# Altium PCB Skipper.PcbDoc (part 3 of 3)
Units mm, origin at the board's own origin, x right, y up, seen from the top; angles counter-clockwise.
Board outline 132 x 77.5 mm, 4 copper layers (L1, L2, L3, L4), stack 1.586 mm thick; 219 components, 173 nets, 859 pads, 487 vias.
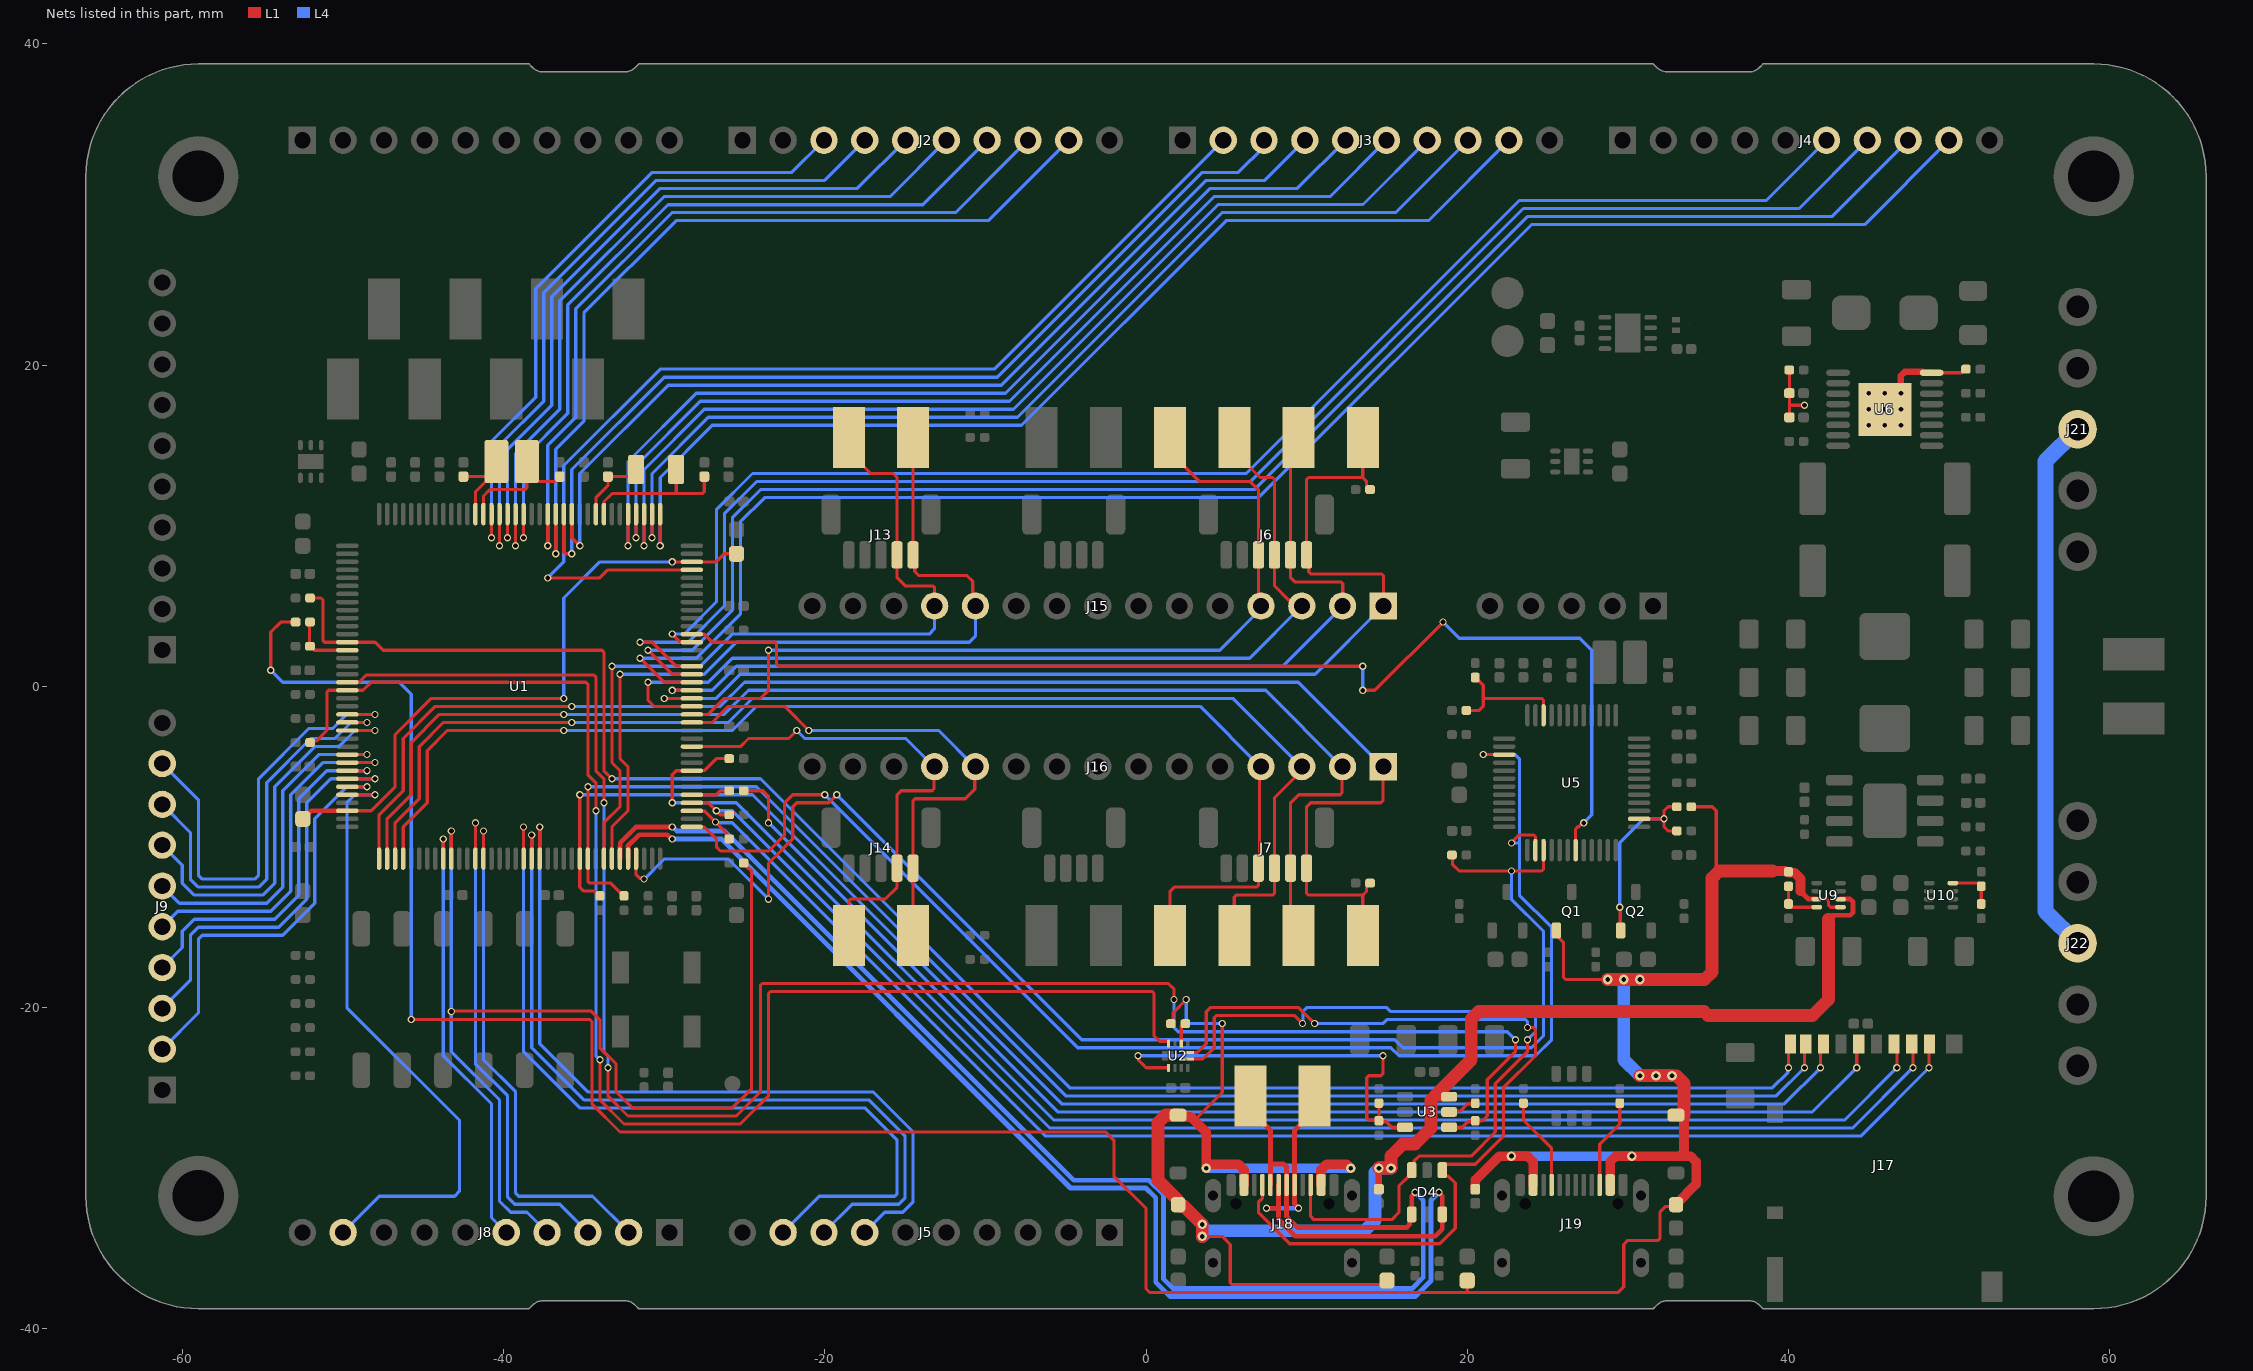
[diagram p5: the nets of this part, all layers, seen from the top]

## Via types
v1: diameter 0.45, hole 0.3, L1 to L4, tented both sides, 298 vias
v2: diameter 0.6, hole 0.3, L1 to L4, tented both sides, 127 vias
v3: diameter 1.25, hole 1, L1 to L4, 39 vias
v4: diameter 0.6, hole 0.3, L1 to L4, 15 vias
v5: diameter 0.5, hole 0.3, L1 to L4, 8 vias

## Nets (pads, with @x,y where several pads share a name; then routed paths per layer and width w, separated by ;. In a path a pad name is that pad's centre, name@x,y a point inside that pad or via, vN(x,y) a via of type N, cw(c..) or ccw(c..) an arc to the next point about the centre after c; other vN are vias at no path point) (continued)
PD12: J8.5 U1.81 | length 27.3
  L1 w0.2: U1.81@-43.75,-10.725 v1(-43.75,-9.5)
  L4 w0.2: v1(-43.75,-9.5) -43.75,-23 -40.75,-26 -40.75,-33.08 J8.5@-39.83,-34
PD13/LED: J8.4 R11.2 U1.82 | length 68.4
  L1 w0.2: U1.82@-43.269,-11.321 -43.25,-11.302 U1.82@-43.25,-10.725 v1(-43.25,-9) ; v1(-43.25,-20.25) -43.222,-20.222 -34.528,-20.222 -34,-20.75 -34,-22.5 -33,-23.5 -33,-25.25 -32,-26.25 -25.75,-26.25 -24.557,-25.057 -24.557,-11.518 -24.85,-11.225 -24.85,-11.195 -25.045,-11 R11.2@-25.075,-11
  L4 w0.2: v1(-43.25,-9) v1(-43.25,-20.25) -43.25,-22.75 -40.25,-25.75 -40.25,-32.05 -39.55,-32.75 -38.54,-32.75 J8.4@-37.29,-34
PD14: J8.3 U1.85 | length 32.3
  L1 w0.2: U1.85@-41.75,-10.725 v1(-41.75,-8.5)
  L4 w0.2: v1(-41.75,-8.5) -41.75,-23.5 -39.75,-25.5 -39.75,-31.8 -39.3,-32.25 -36.5,-32.25 J8.3@-34.75,-34
PD15: J8.2 U1.86 | length 33.2
  L1 w0.2: U1.86@-41.25,-10.725 v1(-41.25,-9)
  L4 w0.2: v1(-41.25,-9) -41.25,-23.25 -39.25,-25.25 -39.25,-31.55 -39.05,-31.75 -34.46,-31.75 J8.2@-32.21,-34
PE0: J3.2 U1.141 | length 66.2
  L1 w0.2: v1(-37.25,6.75) -34,6.75 -33.5,7.25 U1.141@-28.275,7.25
  L4 w0.2: v1(-37.25,6.75) -36.25,7.75 -36.25,13.75 -30.25,19.75 -9.44,19.75 J3.2@4.895,34.085
PE2: J3.9 U1.1 | length 67.8
  L1 w0.2: v1(-30.25,8.75) U1.1@-30.25,10.725
  L4 w0.2: v1(-30.25,8.75) -30.25,13 -27,16.25 -7.75,16.25 5,29 17.59,29 J3.9@22.59,34
PE3: J3.8 U1.2 | length 64.9
  L1 w0.2: v1(-30.75,9.25) U1.2@-30.75,10.725
  L4 w0.2: v1(-30.75,9.25) -30.75,13.25 -27.25,16.75 -8,16.75 4.75,29.5 15.55,29.5 J3.8@20.05,34
PE4: J3.7 U1.3 | length 64
  L1 w0.2: v1(-31.25,8.75) U1.3@-31.25,10.725
  L4 w0.2: v1(-31.25,8.75) -31.25,13.5 -27.5,17.25 -8.25,17.25 4.5,30 13.51,30 J3.7@17.51,34
PE5: J3.6 U1.4 | length 61.1
  L1 w0.2: v1(-31.75,9.25) U1.4@-31.75,10.725
  L4 w0.2: v1(-31.75,9.25) -31.75,13.75 -27.75,17.75 -8.5,17.75 4.25,30.5 11.47,30.5 J3.6@14.97,34
PE6: J3.5 U1.5 | length 60.2
  L1 w0.2: v1(-32.25,8.75) U1.5@-32.25,10.725
  L4 w0.2: v1(-32.25,8.75) -32.25,14 -28,18.25 -8.75,18.25 4,31 9.43,31 J3.5@12.43,34
PE7: J9.9 U1.58 | length 28.5
  L1 w0.2: U1.58@-49.725,-1.75 v1(-48,-1.75)
  L4 w0.2: J9.9@-61.25,-4.81 -59,-7.06 -59,-11.75 -58.75,-12 -55.5,-12 -55.25,-11.75 -55.25,-5.75 -52.125,-2.625 -50.625,-2.625 -49.75,-1.75 v1(-48,-1.75)
PE8: J9.8 U1.59 | length 25.6
  L1 w0.2: U1.59@-49.725,-2.25 v1(-48.5,-2.25)
  L4 w0.2: J9.8@-61.25,-7.35 -59.5,-9.1 -59.5,-12 -59,-12.5 -55.25,-12.5 -54.75,-12 -54.75,-6 -52,-3.25 -50.5,-3.25 -49.5,-2.25 v1(-48.5,-2.25)
PE9: J9.7 U1.60 | length 24.7
  L1 w0.2: U1.60@-49.725,-2.75 v1(-48,-2.75)
  L4 w0.2: J9.7@-61.25,-9.89 -60,-11.14 -60,-12.25 -59.25,-13 -55,-13 -54.25,-12.25 -54.25,-6.25 -51.75,-3.75 -50.25,-3.75 -49.25,-2.75 v1(-48,-2.75)
PE10: J9.6 U1.63 | length 21.8
  L1 w0.2: U1.63@-49.725,-4.25 v1(-48.5,-4.25)
  L4 w0.2: J9.6@-61.25,-12.43 -60.18,-13.5 -54.75,-13.5 -53.75,-12.5 -53.75,-6.5 -51.5,-4.25 v1(-48.5,-4.25)
PE11: J9.5 U1.64 | length 22.7
  L1 w0.2: U1.64@-49.725,-4.75 v1(-48,-4.75)
  L4 w0.2: J9.5@-61.25,-14.97 -60.28,-14 -54.5,-14 -53.25,-12.75 -53.25,-6.75 -51.25,-4.75 v1(-48,-4.75)
PE12: J9.4 U1.65 | length 23.2
  L1 w0.2: U1.65@-49.725,-5.25 v1(-48.5,-5.25)
  L4 w0.2: J9.4@-61.25,-17.51 -60,-16.26 -60,-15.25 -59.25,-14.5 -54.25,-14.5 -52.75,-13 -52.75,-7 -51,-5.25 v1(-48.5,-5.25)
PE13: J9.3 U1.66 | length 26.1
  L1 w0.2: U1.66@-49.725,-5.75 v1(-48,-5.75)
  L4 w0.2: J9.3@-61.25,-20.05 -59.5,-18.3 -59.5,-15.5 -59,-15 -54,-15 -52.25,-13.25 -52.25,-7.25 -50.75,-5.75 v1(-48,-5.75)
PE14: J9.2 U1.67 | length 26.5
  L1 w0.2: U1.67@-49.725,-6.25 v1(-48.5,-6.25)
  L4 w0.2: J9.2@-61.25,-22.59 -59,-20.34 -59,-15.75 -58.75,-15.5 -53.75,-15.5 -51.75,-13.5 -51.75,-8.25 -49.75,-6.25 v1(-48.5,-6.25)
PE15: J8.9 U1.68 | length 39.1
  L1 w0.2: U1.68@-49.725,-6.75 v1(-48,-6.75)
  L4 w0.2: J8.9@-49.99,-34 -47.74,-31.75 -43.05,-31.75 -42.75,-31.45 -42.75,-27 -49.75,-20 -49.75,-7.25 -49.25,-6.75 v1(-48,-6.75)
PF2: J3.4 U1.12 | length 60.4
  L1 w0.2: U1.12@-35.75,10.725 -35.75,9.25 v1(-35.25,8.75)
  L4 w0.2: v1(-35.25,8.75) -35.25,13.25 -29.75,18.75 -9,18.75 3.75,31.5 7.39,31.5 J3.4@9.89,34
PF3: J3.3 U1.13 | length 60
  L1 w0.2: U1.13@-36.25,10.725 -36.25,8.367 -36.133,8.25 v1(-35.75,8.25)
  L4 w0.2: v1(-35.75,8.25) -35.75,13.5 -30,19.25 -9.25,19.25 3.5,32 5.75,32 7.35,33.6 J3.3@7.35,34
PF4: J2.9 U1.14 | length 52.8
  L1 w0.2: v1(-36.75,8.25) U1.14@-36.75,10.725
  L4 w0.2: v1(-36.75,8.25) -36.75,14.75 -35,16.5 -35,23.25 -29.25,29 -9.81,29 J2.9@-4.81,34
PF5: J2.8 U1.15 | length 49.9
  L1 w0.2: v1(-37.25,8.75) U1.15@-37.25,10.725
  L4 w0.2: v1(-37.25,8.75) -37.25,15 -35.5,16.75 -35.5,23.5 -29.5,29.5 -11.85,29.5 -9.1,32.25 J2.8@-7.35,34
PF6: J2.7 U1.18 | length 47.5
  L1 w0.2: v1(-38.75,9.25) U1.18@-38.75,10.725
  L4 w0.2: v1(-38.75,9.25) -38.75,14.25 -36,17 -36,23.75 -29.763,29.987 -13.903,29.987 J2.7@-9.89,34
PF7: J2.6 U1.19 | length 46.6
  L1 w0.2: v1(-39.25,8.75) U1.19@-39.25,10.725
  L4 w0.2: v1(-39.25,8.75) -39.25,14.5 -36.5,17.25 -36.5,24 -30,30.5 -15.93,30.5 J2.6@-12.43,34
PF8: J2.5 U1.20 | length 43.7
  L1 w0.2: v1(-39.75,9.25) U1.20@-39.75,10.725
  L4 w0.2: v1(-39.75,9.25) -39.75,14.75 -37,17.5 -37,24.25 -30.25,31 -17.97,31 J2.5@-14.97,34
PF9: J2.4 U1.21 | length 42.8
  L1 w0.2: v1(-40.25,8.75) U1.21@-40.25,10.725
  L4 w0.2: v1(-40.25,8.75) -40.25,15 -37.5,17.75 -37.5,24.5 -30.5,31.5 -20.01,31.5 J2.4@-17.51,34
PF10: J2.3 U1.22 | length 39.9
  L1 w0.2: v1(-40.75,9.25) U1.22@-40.75,10.725
  L4 w0.2: v1(-40.75,9.25) -40.75,15.25 -38,18 -38,24.75 -30.75,32 -22.05,32 J2.3@-20.05,34
PG6: J5.9 U1.91 | length 52.9
  L1 w0.2: U1.91@-38.75,-10.725 v1(-38.75,-8.75)
  L4 w0.2: v1(-38.75,-8.75) -38.75,-22.75 -35.25,-26.25 -17.5,-26.25 -15.5,-28.25 -15.5,-31.6 -15.65,-31.75 -20.34,-31.75 J5.9@-22.59,-34
PG7: J5.8 U1.92 | length 50
  L1 w0.2: U1.92@-38.25,-10.725 v1(-38.25,-9.25)
  L4 w0.2: v1(-38.25,-9.25) -38.25,-22.5 -35,-25.75 -17.25,-25.75 -15,-28 -15,-31.85 -15.4,-32.25 -18.3,-32.25 J5.8@-20.05,-34
PG8: J5.7 U1.93 | length 49.2
  L1 w0.2: U1.93@-37.75,-10.725 v1(-37.75,-8.75)
  L4 w0.2: v1(-37.75,-8.75) -37.75,-22.25 -34.75,-25.25 -17,-25.25 -14.5,-27.75 -14.5,-32.1 -15.15,-32.75 -16.26,-32.75 J5.7@-17.51,-34
PG12: J4.9 U1.127 | length 102.1
  L1 w0.2: v1(-31.5,1.75) -30,0.25 U1.127@-28.275,0.25
  L4 w0.2: v1(-31.5,1.75) -28,1.75 -25.25,4.5 -25.25,10.25 -23.75,11.75 7,11.75 24,28.75 44.74,28.75 J4.9@49.99,34
PG13: J4.8 U1.128 | length 98.3
  L1 w0.2: v1(-31,2.25) -29.5,0.75 U1.128@-28.275,0.75
  L4 w0.2: v1(-31,2.25) -28.25,2.25 -25.75,4.75 -25.75,10.5 -24,12.25 6.75,12.25 23.75,29.25 42.7,29.25 J4.8@47.45,34
PG14: J4.7 U1.129 | length 96.6
  L1 w0.2: v1(-31.5,2.75) -30.75,2.75 -29.269,1.269 -28.294,1.269 U1.129@-28.275,1.25
  L4 w0.2: v1(-31.5,2.75) -28.5,2.75 -26.25,5 -26.25,10.75 -24.25,12.75 6.5,12.75 23.5,29.75 40.66,29.75 J4.7@44.91,34
PG15: J4.6 U1.132 | length 89.4
  L1 w0.2: v1(-29.5,3.25) -29.019,2.769 -28.294,2.769 U1.132@-28.275,2.75
  L4 w0.2: v1(-29.5,3.25) -28.75,3.25 -26.75,5.25 -26.75,11 -24.5,13.25 6.25,13.25 23.25,30.25 38.62,30.25 J4.6@42.37,34
PMUX1_PR1_10: R61.1 R63.2 U9.4 | length 3
  L1 w0.2: R63.2@40,-13.578 40.172,-13.75 U9.4@41.762,-13.75 ; R63.2@40,-13.575 R61.1@40,-12.425
PMUX2_PR1_10: R62.1 R64.2 U10.4 | length 3
  L1 w0.2: U10.4@50.237,-12.25 51.828,-12.25 52,-12.422 52,-12.425 R62.1@52,-13.575
RENUM_9: Q2.1 R50.1 R51.2 U5.38 | length 13.2
  L1 w0.2: v1(29.5,-13.75) 29.525,-13.775 29.525,-15.175 Q2.1@29.55,-15.2 ; U5.38@30.7,-8.25 v1(32.25,-8.25) ; R51.2@33.075,-9 32.5,-9 32.25,-8.75 v1(32.25,-8.25) ; R50.1@33.075,-7.5 32.5,-7.5 32.25,-7.75 v1(32.25,-8.25)
  L4 w0.2: v1(29.5,-13.75) 29.5,-9.75 31,-8.25 v1(32.25,-8.25)
RTN_10: C60.1 C61.1 R59.1 R60.1 U6.8 U6.17 | length 9.3
  L1 w0.2: C61.1@40.06,16.75 40.06,17.5 ; R60.1@40.06,19.7 40.06,17.5 ; v1(41,17.5) 40.06,17.5 ; U6.8@48.912,19.525 50.78,19.525 51.005,19.75 R59.1@51.075,19.75
  L1 w0.4: v4(47,18.25) 47,19.34 47.234,19.574 48.338,19.574 48.386,19.525 U6.8@48.912,19.525
  other v4: 45,16.25 46,16.25 47,16.25 45,17.25 46,17.25 47,17.25 45,18.25 46,18.25
SDMMC_CLK: J17.5 R18.1 | length 80.9
  L1 w0.2: R18.1@-24.962,-6.5 -23.867,-6.5 -23.5,-6.867 v1(-23.5,-8.5) ; v1(44.25,-23.75) 44.25,-22.65 J17.5@44.375,-22.525
  L4 w0.2: v1(-23.5,-8.5) -5.5,-26.5 41.5,-26.5 v1(44.25,-23.75)
SDMMC_CLK_OUT_2: R18.2 U1.113 | length 2.5
  L1 w0.2: U1.113@-28.275,-6.75 -26.75,-6.75 -26.5,-6.5 R18.2@-25.925,-6.5
SDMMC_CMD: J17.3 R26.1 U1.116 | length 92.6
  L1 w0.2: v1(-29.5,-7.25) -29.5,-5.5 -29.25,-5.25 U1.116@-28.275,-5.25 -28.269,-5.244 -27.494,-5.244 -26.75,-4.5 R26.1@-26.117,-4.5 ; J17.3@46.575,-22.525 46.75,-22.7 v1(46.75,-23.75)
  L4 w0.2: v1(-29.5,-7.25) -25.5,-7.25 -5.75,-27 43.5,-27 v1(46.75,-23.75)
SDMMC_D0: J17.7 R22.1 U1.98 | length 94.7
  L1 w0.2: v1(-35.25,-6.75) -35.25,-12.5 -35,-12.75 -34.325,-12.75 -34.202,-12.873 -34.172,-12.873 -34,-13.045 R22.1@-34,-13.075 ; v1(42,-23.75) 42,-22.7 J17.7@42.175,-22.525
  L4 w0.2: v1(-35.25,-6.75) -24.5,-6.75 -5.25,-26 39.75,-26 v1(42,-23.75)
SDMMC_D1: J17.8 R23.1 U1.99 | length 94.2
  L1 w0.2: v1(-34.75,-6.25) -34.75,-12.133 -34.633,-12.25 -33.325,-12.25 -32.725,-12.85 -32.695,-12.85 -32.5,-13.045 R23.1@-32.5,-13.075 ; v1(41,-23.75) 41,-22.6 J17.8@41.075,-22.525
  L4 w0.2: v1(-34.75,-6.25) -24.25,-6.25 -5,-25.5 39.25,-25.5 v1(41,-23.75)
SDMMC_D2: J17.1 R24.1 U1.111 | length 89.9
  L1 w0.2: U1.111@-28.275,-7.75 -28.256,-7.769 -27.635,-7.769 -27.622,-7.783 -27.467,-7.783 v1(-26.798,-8.452) -26.109,-9.141 -26.109,-9.328 -25.937,-9.5 R24.1@-25.75,-9.5 ; v1(48.75,-23.75) 48.75,-22.55 J17.1@48.775,-22.525
  L4 w0.2: v1@-26.75,-8.5 -25.75,-8.5 -6.25,-28 44.5,-28 v1(48.75,-23.75)
SDMMC_D3: J17.2 R25.1 U1.112 | length 88.4
  L1 w0.2: U1.112@-28.275,-7.25 -27.25,-7.25 v1(-26.75,-7.75) -26.5,-8 -25.823,-8 R25.1@-25.69,-7.867 ; J17.2@47.675,-22.525 47.75,-22.6 v1(47.75,-23.75)
  L4 w0.2: v1(-26.75,-7.75) -25.75,-7.75 -6,-27.5 44,-27.5 v1(47.75,-23.75)
SDMMC_DETECT: J17.SWB R27.1 U1.49 | length 112.4
  L1 w0.2: R27.1@-52.075,5.5 -51.367,5.5 -51.25,5.383 -51.25,2.867 -51.133,2.75 U1.49@-49.725,2.75 -48,2.75 -47.5,2.25 -33.867,2.25 -33.75,2.133 -33.75,-5.25 v1(-33.25,-5.75) ; v1(40,-23.75) 40,-22.65 J17.SWB@40.125,-22.525
  L4 w0.2: v1(-33.25,-5.75) -24,-5.75 -4.75,-25 39,-25 39.954,-24.046 39.954,-23.796 v1(40,-23.75)
SHIELD_11: J21.3 J22.3 | length 33.7
  L4 w1: J22.3@58,-16 56,-14 56,14 J21.3@58,16
SPI1_C\S\: J6.6 J15.1 R1.1 TP10.1 U1.125 | length 68.3
  L1 w0.2: v1(-30,-0.75) U1.125@-28.275,-0.75 ; TP10.1@13.5,15.5 13.5,13 ; R1.1@13.925,12.25 13.895,12.25 13.723,12.422 13.723,12.777 13.5,13 ; J15.1@14.78,5 14.78,6.883 14.663,7 10.25,7 10.133,7.117 10.133,8.047 J6.6@10,8.18 10,12.883 10.117,13 13.5,13
  L4 w0.2: v1(-30,-0.75) -26.75,-0.75 -25.25,0.75 10.53,0.75 J15.1@14.78,5
SPI1_MISO: J6.4 J15.3 TP14.1 U1.124 | length 60.2
  L1 w0.2: v1(-31,0.25) -31,-0.883 -30.633,-1.25 U1.124@-27.725,-1.25 ; TP14.1@5.5,15.5 5.5,14.6 7.1,13 7.883,13 8,12.883 J6.4@8,8.18 8,6.25 8.862,5.388 8.906,5.388 9.294,5 J15.3@9.7,5
  L4 w0.2: v1(-31,0.25) -27.25,0.25 -25.75,1.75 6.45,1.75 J15.3@9.7,5
SPI1_MOSI: J6.3 J15.4 TP16.1 U1.123 | length 54.5
  L1 w0.2: U1.123@-28.275,-1.75 -27.25,-1.75 -26.25,-0.75 -24,-0.75 -23.5,-0.25 v1(-23.5,2.25) ; TP16.1@1.5,15.5 1.5,14.6 3.35,12.75 6.5,12.75 7,12.25 7,5.16 J15.4@7.16,5
  L4 w0.2: v1(-23.5,2.25) 4.59,2.25 7.16,4.82 J15.4@7.16,5
SPI1_SCLK: J6.5 J15.2 TP12.1 U1.126 | length 58.9
  L1 w0.2: v1(-29.5,-0.25) U1.126@-28.275,-0.25 ; TP12.1@9.5,15.5 9,15 J6.5@9,8.18 9,6.75 9.25,6.5 12.133,6.5 12.25,6.383 12.25,5.01 J15.2@12.24,5
  L4 w0.2: v1(-29.5,-0.25) -27,-0.25 -25.5,1.25 8.51,1.25 J15.2@12.25,4.99
SPI2_C\S\: J7.6 J16.1 R8.1 TP11.1 U1.73 | length 92.1
  L1 w0.2: U1.73@-47.75,-10.725 -47.75,-8 -46.25,-6.5 -46.25,-3.25 -44.25,-1.25 v1(-35.75,-1.25) ; TP11.1@13.5,-15.5 13.5,-13 ; R8.1@13.925,-12.25 13.9,-12.25 13.728,-12.422 13.728,-12.772 13.5,-13 ; J16.1@14.74,-5 14.75,-5.01 14.75,-7.133 14.633,-7.25 10.25,-7.25 10,-7.5 J7.6@10,-11.32 10,-12.883 10.117,-13 13.5,-13
  L4 w0.2: v1(-35.75,-1.25) -26.5,-1.25 -25,0.25 9.49,0.25 J16.1@14.74,-5
SPI2_MISO: J7.4 J16.3 TP15.1 U1.75 | length 79.1
  L1 w0.2: U1.75@-46.75,-10.725 -46.75,-8.5 -45.25,-7 -45.25,-3.75 -43.75,-2.25 v1(-35.75,-2.25) ; TP15.1@5.5,-15.5 5.5,-13.117 5.617,-13 7.883,-13 8,-12.883 J7.4@8,-11.32 8,-6.933 9.66,-5.273 J16.3@9.66,-5
  L4 w0.2: v1(-35.75,-2.25) -26,-2.25 -24.5,-0.75 5.41,-0.75 J16.3@9.66,-5
SPI2_MOSI: J7.3 J16.4 TP17.1 U1.76 | length 77.7
  L1 w0.2: U1.76@-46.25,-10.725 -46.25,-8.75 -44.75,-7.25 -44.75,-4 -43.5,-2.75 v1(-36.25,-2.75) ; TP17.1@1.5,-15.5 1.5,-12.75 1.75,-12.5 6.883,-12.5 7,-12.383 J7.3@7,-11.32 7.06,-11.26 7.06,-5.06 J16.4@7.12,-5
  L4 w0.2: v1(-36.25,-2.75) -25.75,-2.75 -24.25,-1.25 3.37,-1.25 J16.4@7.12,-5
SPI2_SCLK: J7.5 J16.2 TP13.1 U1.74 | length 82.7
  L1 w0.2: U1.74@-47.25,-10.725 -47.25,-8.25 -45.75,-6.75 -45.75,-3.5 -44,-1.75 v1(-36.25,-1.75) ; TP13.1@9.5,-15.5 9,-15 J7.5@9,-11.32 9,-7.25 9.5,-6.75 12.083,-6.75 12.2,-6.633 J16.2@12.2,-5
  L4 w0.2: v1(-36.25,-1.75) -26.25,-1.75 -24.75,-0.25 7.45,-0.25 J16.2@12.2,-5
SWCLK: U1.109 U5.15 U5.26 | length 89.3
  L1 w0.2: U1.109@-28.275,-8.75 -28.269,-8.756 -27.494,-8.756 -26.75,-9.5 -26.75,-10 -26.5,-10.25 -23.5,-10.25 -22.5,-9.25 -22.5,-7.25 -22,-6.75 v1(-20,-6.75) ; v1(21,-4.25) U5.15@22.3,-4.25 ; v1(22.75,-9.75) 23.25,-9.25 24.133,-9.25 24.25,-9.367 U5.26@24.25,-10.2
  L4 w0.2: v1(-20,-6.75) -4.25,-22.5 15.25,-22.5 15.75,-23 24.25,-23 25.25,-22 25.25,-15 23.25,-13 23.25,-9.75 ; v1(21,-4.25) 23,-4.25 23.25,-4.5 23.25,-9.75 ; v1(22.75,-9.75) 23.25,-9.75
SWDIO: R43.1 U1.105 U5.27 | length 89.9
  L1 w0.2: U1.105@-31.75,-10.725 -31.75,-11.725 -31.523,-11.952 -31.298,-11.952 v1(-31.25,-12) ; v1(-23.5,-13.25) -23.5,-11 -22,-9.5 -22,-7.5 -21.75,-7.25 -19.75,-7.25 v1(-19.25,-6.75) ; R43.1@19.075,-10.5 19.075,-11.075 19.5,-11.5 v1(22.75,-11.5) 24.633,-11.5 24.75,-11.383 U5.27@24.75,-10.2
  L4 w0.2: v1(-31.25,-12) -30,-10.75 -26,-10.75 v1(-23.5,-13.25) ; v1(-19.25,-6.75) -4,-22 15.5,-22 16,-22.5 24,-22.5 24.75,-21.75 24.75,-15.25 22.75,-13.25 v1(22.75,-11.5)
SWO: U1.133 U5.31 | length 74.5
  L1 w0.2: U1.133@-28.275,3.25 -28.269,3.244 -27.494,3.244 -27,2.75 -23.117,2.75 -23,2.633 -23,1.367 -22.883,1.25 v1(13.5,1.25) ; v1(13.5,-0.25) 14.25,-0.25 v1(18.5,4) ; U5.31@26.75,-10.2 26.75,-8.884 26.891,-8.742 26.94,-8.742 27.182,-8.5 v1(27.25,-8.5)
  L4 w0.2: v1(13.5,-0.25) v1(13.5,1.25) ; v1(18.5,4) 19.5,3 27,3 27.75,2.25 27.75,-8 v1(27.25,-8.5)
U1_HSE_IN_3: C1.2 U1.23 X1.1 | length 8.1
  L1 w0.2: U1.23@-41.25,10.725 -41.25,11.85 -40.85,12.25 -38.667,12.25 -38.55,12.367 X1.1@-38.55,13.3 ; X1.1@-38.55,14 X1.1@-38.55,13.3 ; C1.2@-36.5,13.06 -36.51,13.06 -36.82,12.75 -37.853,12.75 -38.403,13.3 X1.1@-38.55,13.3
U1_HSE_OUT_3: C2.2 U1.24 X1.2 | length 6.4
  L1 w0.2: C2.2@-42.5,13.06 -41.093,13.06 -40.45,13.703 X1.2@-40.45,14 -40.45,13.4 -41.75,12.1 U1.24@-41.75,10.725
U1_LSE_IN_3: C5.2 U1.8 X2.1 | length 9.7
  L1 w0.2: U1.8@-33.75,10.725 -33.744,10.731 -33.744,11.506 -33.25,12 -29.25,12 ; X2.1@-29.25,13.5 -29.25,12 ; C5.2@-27.5,13.06 -27.5,12.117 -27.617,12 -29.25,12
U1_LSE_OUT_3: C6.2 U1.9 X2.2 | length 4.6
  L1 w0.2: U1.9@-34.25,10.725 -34.25,11.75 -33.5,12.5 C6.2@-33.5,13.06 -32.148,13.06 -31.75,13.458 X2.2@-31.75,13.5
U1_VCAP_3: C3.2 C4.2 U1.70 U1.142 | length 39.4
  L1 w0.2: U1.70@-49.725,-7.75 -48.25,-7.75 -46.75,-6.25 -46.75,-3 -44.5,-0.75 v1(-36.25,-0.75) ; v1(-29.5,7.75) U1.142@-28.275,7.75 -26.75,7.75 -26.25,8.25 C3.2@-25.5,8.25
  L1 w0.3: C4.2@-52.5,-8.25 -52.478,-8.25 -51.978,-7.75 U1.70@-49.725,-7.75
  L4 w0.2: v1(-36.25,-0.75) -36.25,5.5 -34,7.75 v1(-29.5,7.75)
UART1_RX: J13.5 J15.11 TP20.1 U1.102 | length 50.9
  L1 w0.2: U1.102@-33.25,-10.725 -33.25,-8.75 -32.25,-7.75 -32.25,-5 -32.75,-4.5 v1(-32.75,0.75) ; TP20.1@-14.5,15.5 J13.5@-14.5,8.18 -14.402,8.082 -14.402,7.152 -14.152,6.902 -11.152,6.902 -10.783,6.533 -10.783,5.163 J15.11@-10.62,5
  L4 w0.2: v1(-32.75,0.75) -27.5,0.75 -25.5,2.75 -11,2.75 -10.62,3.13 J15.11@-10.62,5
UART1_TX: J13.4 J15.12 TP24.1 U1.101 | length 49.6
  L1 w0.2: U1.101@-33.75,-10.725 -33.75,-8.5 -32.75,-7.5 -32.75,-5.25 -33.25,-4.75 v1(-33.25,1.25) ; TP24.1@-18.5,15.5 -17.917,14.917 -17.917,14.017 -17.15,13.25 -15.75,13.25 -15.5,13 J13.4@-15.5,8.18 -15.5,6.75 -15,6.25 -13.277,6.25 -13.16,6.133 J15.12@-13.16,5
  L4 w0.2: v1(-33.25,1.25) -27.75,1.25 -25.75,3.25 -13.5,3.25 -13.174,3.576 -13.174,4.986 J15.12@-13.16,5
UART2_RX: J14.5 J16.11 TP21.1 U1.122 | length 33.5
  L1 w0.2: U1.122@-28.275,-2.25 -27,-2.25 -26,-1.25 -22.5,-1.25 v1(-21,-2.75) ; TP21.1@-14.5,-15.5 J14.5@-14.5,-11.32 -14.5,-7.117 -14.383,-7 -11.25,-7 -10.66,-6.41 J16.11@-10.66,-5
  L4 w0.2: v1(-21,-2.75) -12.91,-2.75 J16.11@-10.66,-5
UART2_TX: J14.4 J16.12 TP25.1 U1.119 | length 31.5
  L1 w0.2: U1.119@-28.275,-3.75 -25.25,-3.75 -24.75,-3.25 -22.25,-3.25 v1(-21.75,-2.75) ; TP25.1@-18.5,-15.5 -18.5,-13.367 -18.383,-13.25 -16.25,-13.25 -15.5,-12.5 J14.4@-15.5,-11.32 -15.5,-6.75 -15.25,-6.5 -13.317,-6.5 -13.2,-6.383 J16.12@-13.2,-5
  L4 w0.2: v1(-21.75,-2.75) -21.25,-3.25 -14.95,-3.25 J16.12@-13.2,-5
USB_D_N: D4.4 J18.A7 J18.B7 TP26.1 U1.103 | length 92.6
  L1 w0.3: U1.103@-32.75,-10.725 -32.75,-9.968 -32.736,-9.954 -32.736,-9.736 -32.167,-9.167 -31.892,-8.892 -31.75,-8.75 v1(-29.5,-8.75) ; TP26.1@6.5,-25.5 6.5,-26.4 7.75,-27.65 7.75,-29.75 ; J18.B7@7.75,-31.045 7.75,-29.75 ; v1(16.75,-31.5) 16.75,-31.541 16.55,-31.741 D4.4@16.55,-32.875 16.4,-33.025 16.4,-33.524 16.224,-33.7 9.45,-33.7 8.743,-32.993 8.743,-31.828 8.75,-31.821 J18.A7@8.75,-31.045 8.75,-29.926 8.574,-29.75 7.75,-29.75
  L4 w0.3: v1(-29.5,-8.75) -29.459,-8.75 -29.196,-9.014 -26.236,-9.014 -4.5,-30.75 0.188,-30.75 1.094,-31.656 1.094,-36.906 1.688,-37.5 16.562,-37.5 17.257,-36.805 17.257,-32.007 v1(16.75,-31.5)
USB_D_P: D4.6 J18.A6 J18.B6 TP27.1 U1.104 | length 97.9
  L1 w0.3: U1.104@-32.25,-10.725 -32.25,-9.938 -31.549,-9.236 -29.804,-9.236 -29.541,-9.5 v1(-29.5,-9.5) ; v1(7.5,-32.5) 8.257,-32.5 ; J18.A6@8.25,-31.045 8.25,-31.821 8.257,-31.828 8.257,-32.5 ; v1(9.5,-32.5) 9.25,-32.249 J18.B6@9.25,-31.045 9.25,-27.65 10.5,-26.4 TP27.1@10.5,-25.5 ; v1(18.25,-31.5) 18.25,-31.541 18.45,-31.741 D4.6@18.45,-32.875 18.45,-33.8 18.014,-34.236 9.299,-34.236 8.257,-33.195 8.257,-32.5
  L4 w0.3: v1(-29.5,-9.5) -26.438,-9.5 -4.701,-31.236 -0.014,-31.236 0.5,-31.75 0.608,-31.858 0.608,-37.108 1.5,-38 16.75,-38 17.743,-37.007 17.743,-32.007 v1(18.25,-31.5) ; v1(7.5,-32.5) v1(9.5,-32.5)
USB_DRP_CC1_6: D4.1 J18.A5 U2.2 | length 56.5
  L1 w0.2: U2.2@2.65,-22.8 3.2,-22.8 3.75,-22.25 3.75,-20.25 4,-20 9.5,-20 9.959,-20.459 v1(10.5,-21) ; J18.A5@7.25,-31.045 7.25,-31.883 7.133,-32 7.117,-32 7,-32.117 7,-32.75 8.95,-34.7 18.3,-34.7 19.25,-33.75 19.25,-30.925 18.818,-30.493 18.646,-30.493 18.45,-30.297 18.45,-29.952 18.646,-29.756 18.761,-29.756 18.767,-29.75 20.5,-29.75 22.25,-28 22.25,-25 24.25,-23 24.25,-21.367 24.133,-21.25 v1(23.75,-21.25)
  L4 w0.2: v1(10.5,-21) 14.75,-21 15,-20.75 23.633,-20.75 23.75,-20.867 v1(23.75,-21.25)
USB_DRP_CC2_6: D4.3 J18.B5 U2.1 | length 50.3
  L1 w0.2: U2.1@2.65,-23.2 3.55,-23.2 4.25,-22.5 4.25,-20.617 4.367,-20.5 9.25,-20.5 v1(9.75,-21) ; J18.B5@10.25,-31.045 10.25,-33 10.45,-33.2 15.3,-33.2 15.75,-32.75 15.75,-31.097 D4.3@16.322,-30.525 ; D4.3@16.323,-30.525 D4.3@16.55,-30.298 ; D4.3@16.55,-30.125 16.706,-29.969 16.706,-29.544 17,-29.25 20.25,-29.25 21.75,-27.75 21.75,-24.75 23.75,-22.75 v1(23.75,-22)
  L4 w0.2: v1(9.75,-21) 9.775,-20.975 9.775,-20.225 10,-20 15,-20 15.25,-20.25 24,-20.25 24.25,-20.5 24.25,-21.5 v1(23.75,-22)
USB_DRP_F\A\U\L\T\: R33.1 U1.54 U3.4 | length 117.4
  L1 w0.2: U1.54@-49.725,0.25 -49.706,0.269 -48.981,0.269 -48.546,0.704 -34.367,0.704 -34.25,0.587 -34.25,-5.25 -33.75,-5.75 v1(-33.75,-7.25) ; v1(-33.5,-23.75) -33.5,-25.5 -32.25,-26.75 -25.5,-26.75 -24,-25.25 -24,-18.617 -23.883,-18.5 1.383,-18.5 1.75,-18.867 v1(1.75,-19.5) ; U3.4@18.875,-27.45 19.7,-27.45 20.042,-27.108 20.255,-27.108 R33.1@20.419,-26.944 ; R33.1@20.5,-27.075 20.533,-27.042 20.958,-27.042 21.25,-26.75 21.25,-24.5 23,-22.75 v1(23,-22)
  L4 w0.2: v1(-33.75,-7.25) -33.75,-22.75 -33.5,-23 v1(-33.5,-23.75) ; v1(1.75,-19.5) 1.75,-21.25 2,-21.5 22.5,-21.5 v1(23,-22)
USB_DRP_I\N\T\: R28.1 U1.55 U2.6 | length 92.7
  L1 w0.2: R28.1@-52.075,-3.5 -51.966,-3.391 -51.641,-3.391 -51,-2.75 -51,-0.367 -50.883,-0.25 U1.55@-49.725,-0.25 -48.75,-0.25 -48.25,0.25 -34.867,0.25 -34.75,0.133 -34.75,-5.5 -34.25,-6 v1(-34.25,-7.75) ; v1(-34,-23.25) -34,-25.75 -32.5,-27.25 -25.25,-27.25 -23.5,-25.5 -23.5,-19.117 -23.383,-19 0.383,-19 0.5,-19.117 0.5,-21.75 0.85,-22.1 1.4,-22.1 U2.6@1.4,-22.25
  L4 w0.2: v1(-34.25,-7.75) -34.25,-23 v1(-34,-23.25)
USB_DRP_ID_6: R32.1 R34.2 U2.9 U3.3 | length 26.1
  L1 w0.2: v1(-0.5,-23) -0.454,-23.046 -0.454,-23.296 -0.183,-23.567 0,-23.75 U2.9@1.4,-23.75 U2.9@1.4,-23.767 ; R34.2@14.5,-27.105 14.964,-27.105 15.309,-27.45 U3.3@16.125,-27.45 ; R32.1@14.5,-25.925 14.5,-27 14.5,-27.075 14.425,-27 13.867,-27 13.75,-26.883 13.75,-24.367 13.867,-24.25 14.633,-24.25 14.75,-24.133 v1(14.75,-23)
  L4 w0.2: v1(-0.5,-23) v1(14.75,-23)
USB_DRP_ILIM_6: R35.2 U3.5 | length 1.9
  L1 w0.2: U3.5@18.875,-26.5 18.931,-26.444 19.556,-26.444 20.025,-25.975 20.45,-25.975 R35.2@20.5,-25.925
USB_DRP_VBUS: C28.2 D2.A D3.K J18.A4/B9 J18.B4/A9 R29.2 R30.2 U3.6 U9.6 | length 118.3
  L1 w0.2: R29.2@1.575,-21 1.684,-20.891 1.684,-20.316 v1(2.5,-19.5) ; 3.02,-27.02 4.75,-25.29 v1(4.75,-21) ; v2(3.5,-34.25) 4.75,-34.25 5.25,-34.75 5.25,-37.133 5.367,-37.25 14.75,-37.25 D2.A@15,-37
  L1 w0.3: 42.5,-14.5 42.75,-14.25 43.843,-14.25 44.019,-14.074 44.019,-13.426 43.843,-13.25 U9.6@43.238,-13.25
  L1 w0.4: C28.2@14.5,-31.31 v2(14.5,-30)
  L1 w0.6: D3.K@2,-26.7 2.09,-26.79 2.79,-26.79 3.02,-27.02 3.75,-27.75 3.75,-29.75 v2(3.75,-30) 4,-29.75 5.749,-29.75 6.1,-30.101 J18.A4/B9@6.1,-31.045 ; J18.B4/A9@10.9,-31.045 10.9,-30.101 11.251,-29.75 12.5,-29.75 v2(12.75,-30) ; 17.75,-25.75 17.95,-25.55 U3.6@18.875,-25.55
  L1 w0.8: R30.2@2,-32.3 2.05,-32.35 2.35,-32.35 v2(3.5,-33.5) v2(3.5,-34.25) ; R30.2@2,-32.275 1.95,-32.225 1.95,-31.95 0.75,-30.75 0.75,-27.169 1.219,-26.7 D3.K@2,-26.7 ; v2(14.5,-30) v2(15.25,-30) 15.25,-29.25 16,-28.5 16.75,-28.5 17.75,-27.5 17.75,-25.75 ; 17.95,-25.55 20.25,-23.25 20.25,-20.719 20.719,-20.25 34.75,-20.25 35,-20.5 41.5,-20.5 42.5,-19.5 42.5,-14.5
  L4 w0.2: v1(2.5,-19.5) 2.5,-20.883 2.617,-21 v1(4.75,-21)
  L4 w0.6: v2(3.75,-30) v2(12.75,-30)
  L4 w0.8: v2(3.5,-33.5) 3.5,-33.9 v2(3.5,-34.25) 3.85,-33.9 13.6,-33.9 14.25,-33.25 14.25,-30.25 v2(14.5,-30) v2(15.25,-30)
USB_DRP_VBUS_DET_6: R29.1 U2.4 | length 1.4
  L1 w0.2: U2.4@2.2,-22.25 2.2,-21.195 2.395,-21 R29.1@2.425,-21
USB_UFP_CC1_7: J19.A5 R39.2 | length 5.8
  L1 w0.2: R39.2@23.5,-25.925 23.5,-27 25.25,-28.75 J19.A5@25.25,-31.045
USB_UFP_CC2_7: J19.B5 R38.2 | length 5.6
  L1 w0.2: J19.B5@28.25,-31.045 28.25,-28.5 29.5,-27.25 R38.2@29.5,-25.925
USB_UFP_DETECT_2: R9.1 R12.2 U1.50 | length 4
  L1 w0.2: R9.1@-52.075,4 -52.075,2.5 -52.005,2.5 -51.755,2.25 U1.50@-49.725,2.25
USB_UFP_VBUS: C34.2 D5.A D6.K J19.A4/B9 J19.B4/A9 Q1.1 R9.2 R36.2 R50.2 R61.2 U9.3 U9.5 | length 208.1
  L1 w0.2: v1(-54.5,1) -54.5,3.383 -53.883,4 R9.2@-52.925,4 ; v1(-45.75,-20.75) -34.617,-20.75 -34.5,-20.867 -34.5,-26 -32.75,-27.75 -2.5,-27.75 -2,-28.25 -2,-30.5 0,-32.5 0,-37.5 0.25,-37.75 20,-37.75 ; D5.A@20,-37.25 20,-37.75 ; Q1.1@25.55,-15.2 25.719,-15.369 25.719,-15.686 26,-15.967 26,-18.133 26.117,-18.25 v2(28.75,-18.25) ; R36.2@33,-32.275 32.892,-32.383 32.367,-32.383 32,-32.75 32,-34.383 31.883,-34.5 30,-34.5 29.75,-34.75 29.75,-37.383 29.383,-37.75 20,-37.75 ; R50.2@33.925,-7.5 35.25,-7.5 35.5,-7.75 35.5,-11.676 ; U9.3@41.762,-13.25 42.383,-13.25 42.5,-13.367 42.5,-13.633 42.617,-13.75 U9.5@43.238,-13.75
  L1 w0.3: 40.75,-12.75 41.25,-13.25 U9.3@41.762,-13.25
  L1 w0.6: C34.2@20.5,-31.31 20.51,-31.3 20.51,-30.74 22,-29.25 v2(22.75,-29.25) 23.749,-29.25 24.1,-29.601 J19.A4/B9@24.1,-31.045 ; J19.B4/A9@28.9,-31.045 28.9,-29.601 29.251,-29.25 v2(30.25,-29.25) 33.25,-29.25 ; R36.2@33,-32.275 33,-32.25 34.25,-31 34.25,-29.601 33.899,-29.25 33.25,-29.25 ; D6.K@33.5,-26.7 33.5,-29 33.25,-29.25 ; 39,-11.5 39.794,-11.5 39.844,-11.55 39.975,-11.55 40,-11.575 40.025,-11.6 40.374,-11.6 40.75,-11.976 40.75,-12.75
  L1 w0.8: v2(28.75,-18.25) v2(29.75,-18.25) v2(30.75,-18.25) 34.781,-18.25 35.25,-17.781 35.25,-11.926 35.676,-11.5 39,-11.5 ; v2(30.75,-24.25) v2(31.75,-24.25) v2(32.75,-24.25) 33.031,-24.25 33.5,-24.719 D6.K@33.5,-26.7
  L4 w0.2: v1(-54.5,1) -53.75,0.25 -46.5,0.25 -45.75,-0.5 v1(-45.75,-20.75)
  L4 w0.6: v2(22.75,-29.25) v2(30.25,-29.25)
  L4 w0.8: v2(28.75,-18.25) v2(29.75,-18.25) ; v2(30.75,-18.25) v2(29.75,-18.25) ; v2(32.75,-24.25) v2(31.75,-24.25) v2(30.75,-24.25) 29.75,-23.25 v2(29.75,-18.25)
V_TGT_DIV2_9: R48.1 R49.2 U5.10 | length 7.9
  L1 w0.2: R48.1@19.925,-1.5 20.75,-1.5 21,-1.25 21,-0.75 ; R49.2@20.5,0.575 21,0.075 21,-0.75 ; U5.10@24.75,-1.8 24.75,-0.867 24.633,-0.75 21,-0.75
pads on no net: D4.5 D7.5 J6.NC J7.NC J11.NC J12.NC J13.NC J14.NC J18. J18.A8 J18.B8 J19. J19.A8 J19.B8 U1.7 U5.3 U5.4 U5.11 U5.14 U5.16 U5.17 U5.19 U5.21 U5.22 U5.28 U5.29 U5.39 U5.40 U5.41 U5.43 U5.45 U5.46 U6.4 U6.6 U6.7 U6.10 U6.13 U9.8 U10.8

## Polygon pours and split planes (outlines as drawn)
GND on L1 "NONET_L01_P-001" (solid, pour order 28): 17.999,12.499 17.999,17.501 cw(c18.999,17.501) 18.999,18.501 34.001,18.501 cw(c34.001,17.501) 35.001,17.501 35.001,12.499 cw(c34.001,12.499) 34.001,11.499 18.999,11.499 cw(c18.999,12.499)
GND on L1 "NONET_L01_P-001" (solid, remove dead copper, pour order 26): 36,-18 36,25.501 cw(c37,25.501) 37,26.501 55.001,26.501 cw(c55.001,25.501) 56.001,25.501 56.001,-18 cw(c55.001,-18) 55.001,-19 37,-19 cw(c37,-18)
5V_BUCK on L1 "NONET_L01_P-001" (solid, remove dead copper, pour order 22): 52.381,-13.5 52.363,-13.519 52.363,-14.144 51.637,-14.144 51.637,-14.706 52.956,-14.706 53,-14.75 53,5 42.25,5 42.25,1.5 49.75,1.5 49.75,-11.5 48.25,-11.5 48.25,-12.5 49.25,-12.5 49.25,-13 49.75,-13 49.75,-13.5
EFUSE_OUT_10 on L1 "NONET_L01_P-001" (solid, pour order 18): 40.5,15.75 44,15.75 44,15.25 49,15.25 49,9.75 52.5,9.75 52.5,5 42.25,5 42.25,-4.25 40.5,-4.25 40.5,-6.75 44,-6.75 44,-7.75 39,-7.75 39,9.5 39.25,9.5 43,9.5 43,14.5 40.5,14.5
HVIN on L1 "NONET_L01_P-001" (solid, pour order 17): 44,20.25 44,21 39.5,21 39.5,22 45.25,22 45.25,26.5 50.25,26.5 50.25,23.25 52.75,23.25 54.75,21.25 66,21.25 66,-10.25 56,-10.25 56,5 54.5,5 54.5,14.5 48.25,14.5 48.25,15.75 52.5,15.75 52.5,20.25
5V on L1 "NONET_L01_P-001" (solid, pour order 14): 48,-13 50.682,-13 50.682,-13.5 49.5,-13.5 49.5,-17.5 43,-17.5 43,-14.75 48,-14.75
5V_USB on L1 "NONET_L01_P-001" (solid, pour order 15): 43.75,-12.5 43.75,-11.5 48.192,-11.5 48.25,-11.558 48.25,-12.5 49.25,-12.5 49.25,-13 41.5,-13 41.5,-12.5
HVIN_UNFUSED_11 on L1 "NONET_L01_P-001" (solid, pour order 16): 50.25,26.5 66,26.5 66,21.25 54.75,21.25 52.75,23.25 50.25,23.25
BUCK_SW_10 on L1 "NONET_L01_P-001" (solid, pour order 20): 49.75,-6.25 47.75,-6.25 47.75,-4.25 42.25,-4.25 42.25,-1 49.75,-1
GND on L4 "NONET_L01_P-001" (solid, pour order 27): 17.999,12.499 17.999,17.501 cw(c18.999,17.501) 18.999,18.501 34.001,18.501 cw(c34.001,17.501) 35.001,17.501 35.001,12.499 cw(c34.001,12.499) 34.001,11.499 18.999,11.499 cw(c18.999,12.499)
HVIN on L4 "NONET_L01_P-001" (solid, pour order 25): 56,26.5 66.25,26.5 66.25,-10.25 56,-10.25
GND on L4 "NONET_L01_P-001" (solid, remove dead copper, pour order 24): 36,-18 36,25.501 cw(c37,25.501) 37,26.501 55.001,26.501 cw(c55.001,25.501) 56.001,25.501 56.001,-18 cw(c55.001,-18) 55.001,-19 37,-19 cw(c37,-18)
RTN_10 on L4 "NONET_L01_P-001" (solid, pour order 23): 51.75,22.75 40.25,22.75 40.25,-5 51.75,-5
GND on L3 "NONET_L01_P-001" (solid, pour order 19): -66,39 66,39 66,-39 -66,-39
GND on L2 "NONET_L01_P-001" (solid, pour order 21): -66,39 66,39 66,-39 -66,-39

## Other copper
L1:
  region net GND: -59,-38.75 -39.121,-38.75 -38.561,-38.189 cw(c-37.5,-39.25) -37.5,-37.75 -32.5,-37.75 cw(c-32.5,-39.25) -31.439,-38.189 -30.879,-38.75 -0.8,-38.75 -0.8,-35.25 -54,-35.25 -54,-26.75 -62.5,-26.75 -62.5,26.75 -54,26.75 -54,35.25 54,35.25 54,26.75 66,26.75 66,31.75 ccw(c59,31.75) 59,38.75 39.121,38.75 38.561,38.189 cw(c37.5,39.25) 37.5,37.75 32.5,37.75 cw(c32.5,39.25) 31.439,38.189 30.879,38.75 -30.75,38.75 -31.311,38.189 cw(c-32.371,39.25) -32.371,37.75 -37.75,37.75 cw(c-37.75,39.25) -38.811,38.189 -39.371,38.75 -59,38.75 ccw(c-59,31.75) -66,31.75 -66,-31.75 ccw(c-59,-31.75)
  region net GND: 54,-38.75 59,-38.75 ccw(c59,-31.75) 66,-31.75 66,-26.75 54,-26.75
  region net GND: -23,-25.5 -23,-21 cw(c-22,-21) -22,-20 -2,-20 cw(c-2,-21) -1,-21 -1,-25.5 cw(c-2,-25.5) -2,-26.5 -22,-26.5 cw(c-22,-25.5)
  region net GND: 33.91,22.05 33.47,22.05 33.47,22.95 33.91,22.95 33.91,22.65 34.25,22.65 34.25,22.35 33.91,22.35
L4:
  region net GND: -59,-38.75 -39.121,-38.75 -38.561,-38.189 cw(c-37.5,-39.25) -37.5,-37.75 -32.5,-37.75 cw(c-32.5,-39.25) -31.439,-38.189 -30.879,-38.75 -0.8,-38.75 -0.8,-35.25 -54,-35.25 -54,-26.75 -62.5,-26.75 -62.5,26.75 -54,26.75 -54,35.25 54,35.25 54,26.75 66,26.75 66,31.75 ccw(c59,31.75) 59,38.75 39.121,38.75 38.561,38.189 cw(c37.5,39.25) 37.5,37.75 32.5,37.75 cw(c32.5,39.25) 31.439,38.189 30.879,38.75 -30.75,38.75 -31.311,38.189 cw(c-32.371,39.25) -32.371,37.75 -37.75,37.75 cw(c-37.75,39.25) -38.811,38.189 -39.371,38.75 -59,38.75 ccw(c-59,31.75) -66,31.75 -66,-31.75 ccw(c-59,-31.75)
  region net GND: 54,-38.75 59,-38.75 ccw(c59,-31.75) 66,-31.75 66,-26.75 54,-26.75

## Silkscreen, mask and mechanical layers (free items; w line width, h text height)
Top Overlay:
  lines w0.25: 0,-38 0,-21 cw(c1,-21) 1,-20 55,-20 cw(c55,-21) 56,-21 56,-26 ; 21.5,-9.5 21.5,-10.5 ccw(c22,-10.5) 22,-11 23,-11 ; 21.5,-2.5 21.5,-1.5 cw(c22,-1.5) 22,-1 23,-1 ; 30,-11 31,-11 ccw(c31,-10.5) 31.5,-10.5 31.5,-9.5 ; 30,-1 31,-1 cw(c31,-1.5) 31.5,-1.5 31.5,-2.5 ; -54,-25.5 ccw(c-53,-25.5) -53,-26.5 -24.997,-26.5 ccw(c-24.997,-25.5) -23.997,-25.5 -23.997,25.503 ccw(c-24.997,25.503) -24.997,26.503 -53,26.503 ccw(c-53,25.503) -54,25.503 -54,-25.5 ; -23,-25.5 ccw(c-22,-25.5) -22,-26.5 -1.997,-26.5 ccw(c-1.997,-25.5) -0.997,-25.5 -0.997,-20.997 ccw(c-1.997,-20.997) -1.997,-19.997 -22,-19.997 ccw(c-22,-20.997) -23,-20.997 -23,-25.5 ; -23,-18 ccw(c-22,-18) -22,-19 16.003,-19 ccw(c16.003,-18) 17.003,-18 17.003,18.003 ccw(c16.003,18.003) 16.003,19.003 -22,19.003 ccw(c-22,18.003) -23,18.003 -23,-18 ; -23,21 ccw(c-22,21) -22,20 16.003,20 ccw(c16.003,21) 17.003,21 17.003,25.503 ccw(c16.003,25.503) 16.003,26.503 -22,26.503 ccw(c-22,25.503) -23,25.503 -23,21 ; 18,-18 ccw(c19,-18) 19,-19 34.003,-19 ccw(c34.003,-18) 35.003,-18 35.003,9.503 ccw(c34.003,9.503) 34.003,10.503 19,10.503 ccw(c19,9.503) 18,9.503 18,-18 ; 17.999,12.499 ccw(c18.999,12.499) 18.999,11.499 34.002,11.499 ccw(c34.002,12.499) 35.002,12.499 35.002,17.502 ccw(c34.002,17.502) 34.002,18.502 18.999,18.502 ccw(c18.999,17.502) 17.999,17.502 17.999,12.499 ; 18,20.5 ccw(c19,20.5) 19,19.5 34.003,19.5 ccw(c34.003,20.5) 35.003,20.5 35.003,25.503 ccw(c34.003,25.503) 34.003,26.503 19,26.503 ccw(c19,25.503) 18,25.503 18,20.5 ; 36,-18 ccw(c37,-18) 37,-19 55.003,-19 ccw(c55.003,-18) 56.003,-18 56.003,25.503 ccw(c55.003,25.503) 55.003,26.503 37,26.503 ccw(c37,25.503) 36,25.503 36,-18
  text "3V3A" at -53.245,32.25 h3 r270
  text "PA4" at -50.705,32.248 h3 r270
  text "PA3" at -48.165,32.248 h3 r270
  text "PA2" at -45.643,32.248 h3 r270
  text "PA1" at -43.085,32.248 h3 r270
  text "PA0" at -40.545,32.248 h3 r270
  text "PC3" at -38.005,32.248 h3 r270
  text "PC2" at -35.465,32.248 h3 r270
  text "PC1" at -32.925,32.248 h3 r270
  text "GND" at -30.385,32.248 h3 r270
  text "3V3" at -25.845,32.25 h3 r270
  text "PB2" at -23.323,32.248 h3 r270
  text "PF10" at -20.765,32.248 h3 r270
  text "PF9" at -18.243,32.248 h3 r270
  text "PF8" at -15.685,32.248 h3 r270
  text "PF7" at -13.145,32.248 h3 r270
  text "PF6" at -10.588,32.248 h3 r270
  text "PF5" at -8.048,32.248 h3 r270
  text "PF4" at -5.525,32.248 h3 r270
  text "GND" at -2.985,32.248 h3 r270
  text "3V3" at 1.555,32.25 h3 r270
  text "PE0" at 4.095,32.248 h3 r270
  text "PF3" at 6.635,32.248 h3 r270
  text "PF2" at 9.157,32.248 h3 r270
  text "PE6" at 11.732,32.248 h3 r270
  text "PE5" at 14.272,32.248 h3 r270
  text "PE4" at 16.795,32.248 h3 r270
  text "PE3" at 19.335,32.248 h3 r270
  text "PE2" at 21.857,32.248 h3 r270
  text "GND" at 24.415,32.248 h3 r270
  text "3V3" at 28.955,32.25 h3 r270
  text "PB7" at 31.495,32.248 h3 r270
  text "PB6" at 34.052,32.248 h3 r270
  text "PB5" at 36.592,32.248 h3 r270
  text "PB4" at 39.115,32.248 h3 r270
  text "PG15" at 41.655,32.248 h3 r270
  text "PG14" at 44.195,32.248 h3 r270
  text "PG13" at 46.735,32.248 h3 r270
  text "PG12" at 49.275,32.248 h3 r270
  text "GND" at 51.815,32.248 h3 r270
  text "IN: 7–36V" at 36.845,25.498 h2.75 r270
  text "Power Supply" at 54.022,25.498 h2.75 r270
  text "GND" at -59.498,24.415 h3
  text "CAN XCVR" at 24.726,24.345 h2.75
  text "TX" at 19.002,23.904 h2.5
  text "PA5" at -59.498,21.892 h3
  text "Founders Edition" at -20.039,21.873 h6.5
  text "RX" at 19.002,20.904 h2.5
  text "PA6" at -59.498,19.352 h3
  text "PA7" at -59.498,16.795 h3
  text "3.3V LDO" at 25.794,16.345 h2.75
  text "PC4" at -59.498,14.255 h3
  text "UART1" at -11.198,13.455 h3 r270
  text "PC5" at -59.498,11.715 h3
  text "I2C1" at 0.285,11.359 h3 r270
  text "SPI1" at 13.285,11.22 h3 r270
  text "PB0" at -59.498,9.175 h3
  text "DAPLink" at 21.234,7.481 h4
  text "PB1" at -59.498,6.635 h3
  text "PC0" at -59.498,4.095 h3
  text "CANH" at 58.672,3.785 h3
  text "MISO" at 8.985,2.529 h3 r270
  text "MOSI" at 6.445,2.494 h3 r270
  text "SCLK" at 11.525,2.477 h3 r270
  text "GND" at -21.495,2.253 h3 r270
  text "GND" at -8.795,2.253 h3 r270
  text "GND" at 1.365,2.253 h3 r270
  text "SDA" at -3.715,2.049 h3 r270
  text "3V3" at -18.955,1.786 h3 r270
  text "3V3" at -6.255,1.786 h3 r270
  text "3V3" at 3.905,1.786 h3 r270
  text "SCL" at -1.175,1.769 h3 r270
  text "3V3A" at -59.5,1.555 h3
  text "5V" at -16.398,1.246 h3 r270
  text "TX" at -13.875,1.231 h3 r270
  text "RX" at -11.335,1.217 h3 r270
  text "CS" at 14.065,1.189 h3 r270
  text "GND" at -59.498,-2.985 h3
  text "CANL" at 58.829,-5.215 h3
  text "PE7" at -59.498,-5.525 h3
  text "OUT: 5V / 2A" at 37.092,-6.429 h2.75 r270
  text "UART2" at -11.215,-7.502 h3 r270
  text "I2C2" at 0.285,-7.502 h3 r270
  text "SPI2" at 13.285,-7.5 h3 r270
  text "PE8" at -59.498,-8.065 h3
  text "PE9" at -59.498,-10.623 h3
  text "PE10" at -59.498,-13.145 h3
  text "PE11" at -59.498,-15.685 h3
  text "B" at -26.998,-18.215 h3
  text "PE12" at -59.498,-18.243 h3
  text "PE13" at -59.498,-20.765 h3
  text "R" at -26.998,-22.215 h3
  text "DN" at 5.332,-22.846 h2.5
  text "DP" at 9.438,-22.846 h2.5
  text "PE14" at -59.498,-23.305 h3
  text "3V3" at -59.5,-25.845 h3
  text "PD10" at -45.625,-27.276 h3 r270
  text "PD14" at -35.465,-27.255 h3 r270
  text "PD12" at -40.563,-27.305 h3 r270
  text "PD13" at -38.005,-27.316 h3 r270
  text "PD15" at -32.908,-27.314 h3 r270
  text "PA15" at -10.588,-27.43 h3 r270
  text "PB10" at -48.165,-27.514 h3 r270
  text "PD11" at -43.085,-27.591 h3 r270
  text "PE15" at -50.688,-27.626 h3 r270
  text "GND" at -53.245,-27.743 h3 r270
  text "GND" at -25.845,-27.743 h3 r270
  text "PG6" at -23.305,-28.476 h3 r270
  text "PG8" at -18.225,-28.497 h3 r270
  text "PD4" at -5.525,-28.488 h3 r270
  text "Micro SD" at 36.285,-28.502 h3 r270
  text "PG7" at -20.765,-28.536 h3 r270
  text "PD3" at -8.065,-28.549 h3 r270
  text "PC6" at -15.685,-28.632 h3 r270
  text "3V3" at -30.385,-28.678 h3 r270
  text "PC7" at -13.145,-28.693 h3 r270
  text "3V3" at -2.985,-28.678 h3 r270
  text "Debug" at 23.431,-29.522 h3
  text "USB DRP" at 4.374,-29.715 h3
Top Solder:
  region: -59,-38.75 -39.121,-38.75 -38.561,-38.189 cw(c-37.5,-39.25) -37.5,-37.75 -32.5,-37.75 cw(c-32.5,-39.25) -31.439,-38.189 -30.879,-38.75 -0.8,-38.75 -0.8,-35.25 -54,-35.25 -54,-26.75 -62.5,-26.75 -62.5,26.75 -54,26.75 -54,35.25 54,35.25 54,26.75 66,26.75 66,31.75 ccw(c59,31.75) 59,38.75 39.121,38.75 38.561,38.189 cw(c37.5,39.25) 37.5,37.75 32.5,37.75 cw(c32.5,39.25) 31.439,38.189 30.879,38.75 -30.75,38.75 -31.311,38.189 cw(c-32.371,39.25) -32.371,37.75 -37.75,37.75 cw(c-37.75,39.25) -38.811,38.189 -39.371,38.75 -59,38.75 ccw(c-59,31.75) -66,31.75 -66,-31.75 ccw(c-59,-31.75)
  region: 54,-38.75 59,-38.75 ccw(c59,-31.75) 66,-31.75 66,-26.75 54,-26.75
  text "Skipper" at -19.795,-24.381 h6.5
Bottom Solder:
  region: -59,-38.75 -39.121,-38.75 -38.561,-38.189 cw(c-37.5,-39.25) -37.5,-37.75 -32.5,-37.75 cw(c-32.5,-39.25) -31.439,-38.189 -30.879,-38.75 -0.8,-38.75 -0.8,-35.25 -54,-35.25 -54,-26.75 -62.5,-26.75 -62.5,26.75 -54,26.75 -54,35.25 54,35.25 54,26.75 66,26.75 66,31.75 ccw(c59,31.75) 59,38.75 39.121,38.75 38.561,38.189 cw(c37.5,39.25) 37.5,37.75 32.5,37.75 cw(c32.5,39.25) 31.439,38.189 30.879,38.75 -30.75,38.75 -31.311,38.189 cw(c-32.371,39.25) -32.371,37.75 -37.75,37.75 cw(c-37.75,39.25) -38.811,38.189 -39.371,38.75 -59,38.75 ccw(c-59,31.75) -66,31.75 -66,-31.75 ccw(c-59,-31.75)
  region: 54,-38.75 59,-38.75 ccw(c59,-31.75) 66,-31.75 66,-26.75 54,-26.75
Mechanical 1:
  lines w0.001: -59,-38.75 cw(c-59,-31.75) -66,-31.75 -66,31.75 cw(c-59,31.75) -59,38.75 ; 59,-38.75 ccw(c59,-31.75) 66,-31.75 66,31.75 ccw(c59,31.75) 59,38.75
  lines w0.01: -59,-38.75 -38.414,-38.75 -38.207,-38.543 cw(c-37.5,-39.25) -37.5,-38.25 ; -59,38.75 -38.414,38.75 ; -37.498,-38.25 -32.5,-38.25 cw(c-32.5,-39.25) -31.793,-38.543 -31.586,-38.75 31.586,-38.75 31.793,-38.543 cw(c32.5,-39.25) 32.5,-38.25 ; -32.502,38.25 -37.5,38.25 cw(c-37.5,39.25) -38.207,38.543 -38.414,38.75 ; 32.502,-38.25 37.5,-38.25 cw(c37.5,-39.25) 38.207,-38.543 38.414,-38.75 59,-38.75 ; 37.498,38.25 32.5,38.25 cw(c32.5,39.25) 31.793,38.543 31.586,38.75 -31.586,38.75 -31.793,38.543 cw(c-32.5,39.25) -32.5,38.25 ; 59,38.75 38.414,38.75 38.207,38.543 cw(c37.5,39.25) 37.5,38.25 ; -38.414,38.75 -38.414,38.75 ; -37.5,-38.25 -37.5,-38.25 ; -32.5,38.25 -32.5,38.25 ; 32.5,-38.25 32.5,-38.25 ; 37.5,38.25 37.5,38.25 ; -36,-38.25 -36,-38.25 ; -34,38.25 -34,38.25 ; 34,-38.25 34,-38.25 ; 36,38.25 36,38.25
Mechanical 15:
  lines w0.01: -66,-31.75 ccw(c-59,-31.75) -59,-38.75 -39.121,-38.75 -38.561,-38.189 cw(c-37.5,-39.25) -37.5,-37.75 -32.5,-37.75 cw(c-32.5,-39.25) -31.439,-38.189 -30.879,-38.75 -0.8,-38.75 -0.8,-35.25 -54,-35.25 -54,-26.75 -62.5,-26.75 -62.5,26.75 -54,26.75 -54,35.25 54,35.25 54,26.75 66,26.75 66,31.75 ccw(c59,31.75) 59,38.75 39.121,38.75 38.561,38.189 cw(c37.5,39.25) 37.5,37.75 32.5,37.75 cw(c32.5,39.25) 31.439,38.189 30.879,38.75 -30.75,38.75 -31.311,38.189 cw(c-32.371,39.25) -32.371,37.75 -37.75,37.75 cw(c-37.75,39.25) -38.811,38.189 -39.371,38.75 -59,38.75 ccw(c-59,31.75) -66,31.75 -66,-31.75 ; -38,-38.25 -38,-38.25 ; -36,-37.75 -36,-37.75 ; -34.25,37.75 -34.25,37.75 ; -32.25,38.25 -32.25,38.25 ; 36,37.75 36,37.75 ; 38,38.25 38,38.25 ; 54,-38.75 54,-26.75 66,-26.75 66,-31.75 cw(c59,-31.75) 59,-38.75 54,-38.75

## Text inside footprints (layer, text, board x,y; h text height)
C49: Top Assembly "+" at 42.3,6.804 h1.52 r90; Top Assembly "-" at 42.308,11.604 h1.52 r90
C50: Top Assembly "+" at 51.3,6.804 h1.52 r90; Top Assembly "-" at 51.308,11.604 h1.52 r90
D1: Top Assembly "-" at -25.35,-14.2 h0.6 r90; Top Assembly "+" at -25.35,-13.2 h0.6 r90
D2: Top Assembly "-" at 14.85,-35.55 h0.6 r270; Top Assembly "+" at 14.85,-36.55 h0.6 r270
D3: Top Assembly "+" at 2.313,-30.046 h1 r90; Top Assembly "-" at 2.446,-27.646 h1 r90
D5: Top Assembly "-" at 19.85,-35.55 h0.6 r270; Top Assembly "+" at 19.85,-36.55 h0.6 r270
D6: Top Assembly "+" at 33.313,-30.046 h1 r90; Top Assembly "-" at 33.446,-27.646 h1 r90
D8: Top Assembly "-" at 31.2,-16.85 h0.6 r180; Top Assembly "+" at 30.2,-16.85 h0.6 r180
D9: Top Assembly "-" at 21.8,-17.15 h0.6; Top Assembly "+" at 22.8,-17.15 h0.6
J17: Mechanical 13 "PCB Edge" at 43.632,-39.37 h0.61
J18: Mechanical 13 "BOARD EDGE" at 4.05,-37.725 h0.4; Mechanical 13 "PORT EDGE" at 4,-39.275 h0.4
J19: Mechanical 13 "PORT EDGE" at 22,-39.275 h0.4; Mechanical 13 "BOARD EDGE" at 22.05,-37.725 h0.4
J21: Mechanical 13 "Component Edge" at 68.668,5.716 h1.52 r90
J22: Mechanical 13 "Component Edge" at 68.668,-26.284 h1.52 r90